# Altium PCB Standby_PS_V2..PcbDoc (part 2 of 2)
Units mm, origin at the board's own origin, x right, y up, seen from the top; angles counter-clockwise.
Board outline 250 x 85 mm, 2 copper layers (Top Layer, Bottom Layer), stack 1.071 mm thick; 195 components, 81 nets, 445 pads, 21 vias.
Unrouted connection lines stored in the file: 2.
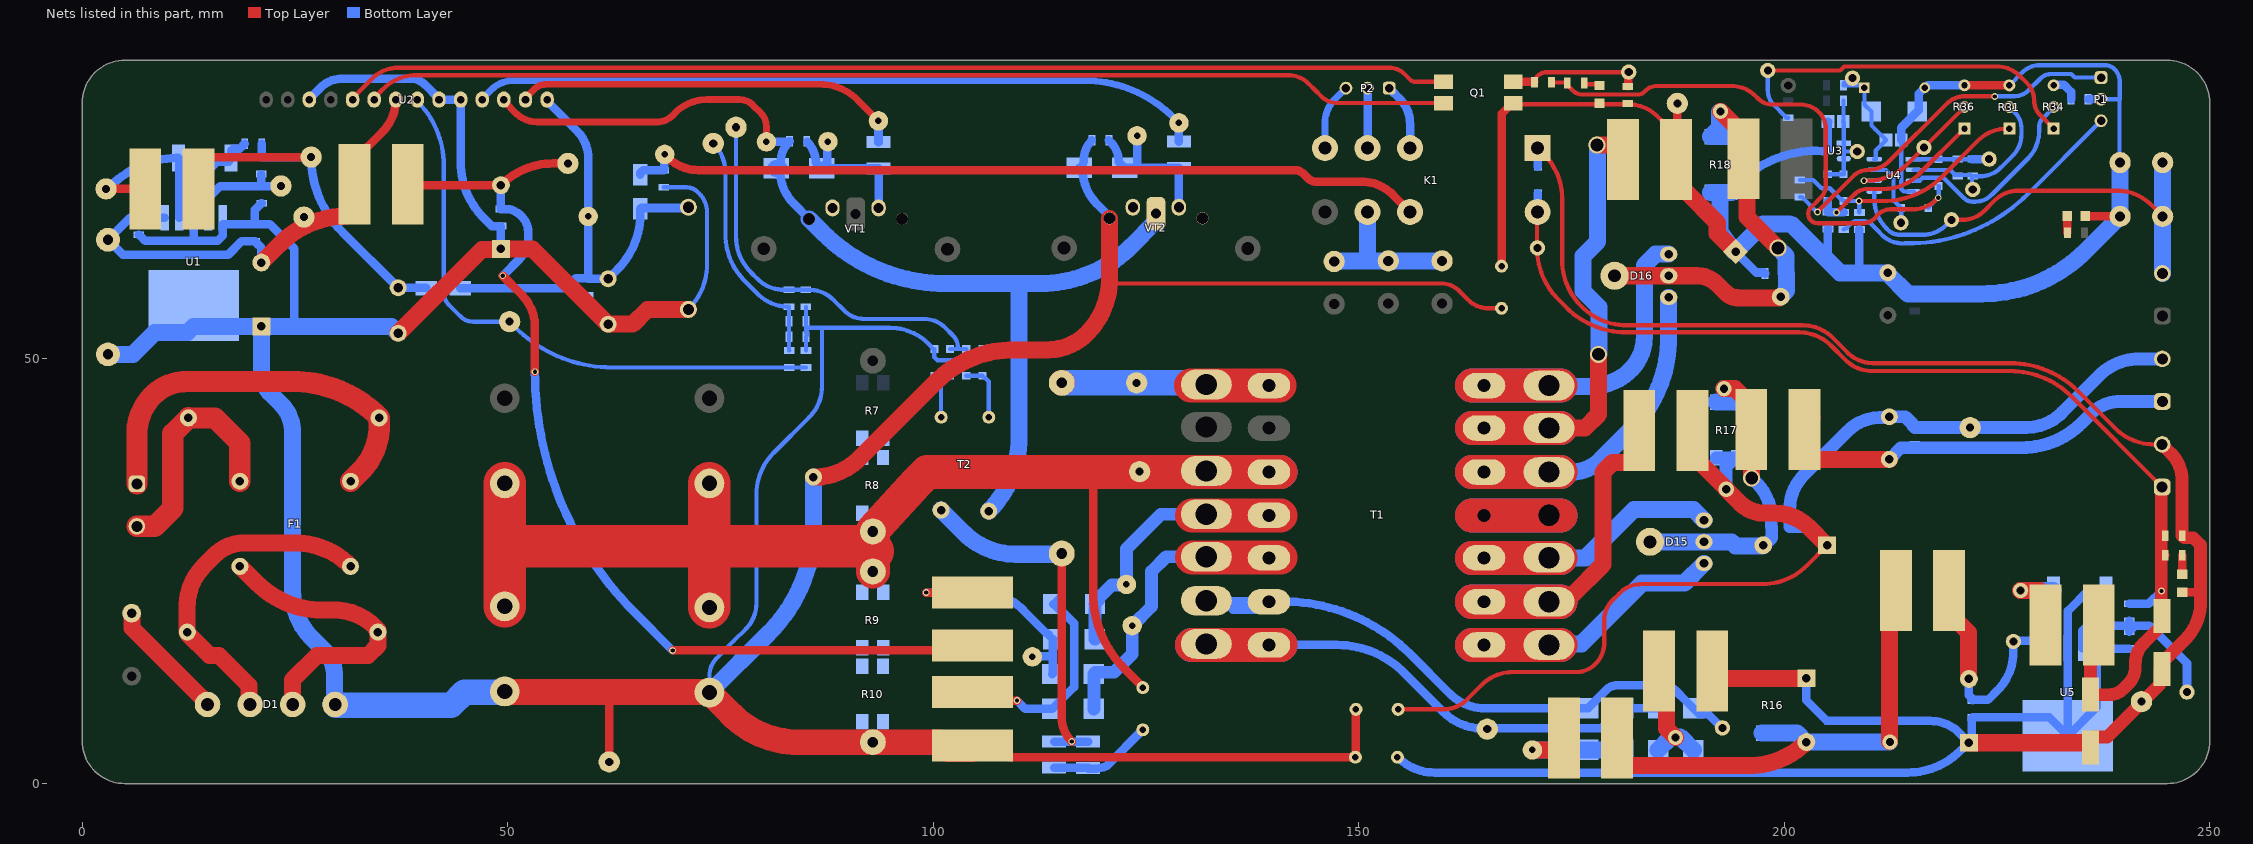
[diagram p2: the nets of this part, all layers, seen from the top]

## Via types
v1: diameter 0.8, hole 0.5, Top Layer to Bottom Layer, tented both sides, 14 vias
v2: diameter 2, hole 1.5, Top Layer to Bottom Layer, tented both sides, 4 vias
v3: diameter 2, hole 1, Top Layer to Bottom Layer, tented both sides, 2 vias
v4: diameter 1.8, hole 1, Top Layer to Bottom Layer, tented both sides, 1 vias

## Nets (pads, with @x,y where several pads share a name; then routed paths per layer and width w, separated by ;. In a path a pad name is that pad's centre, name@x,y a point inside that pad or via, vN(x,y) a via of type N, cw(c..) or ccw(c..) an arc to the next point about the centre after c; other vN are vias at no path point) (continued)
GND: C1.2 C2.1 C4.2 C5.2 C6.2 C8.2 C9.1 C12.2 C14.2 C16.1 C18.2 C19.2 C20.1 C21.1 C22.1 C23.1 C24.1 C25.1 C26.1 D1.1 D2.2 D8.2 D10.2 L3.1 R2.1 R6.2 R10.1 R23.2 TP2.1 U1.3 U1.5 U1.6 U2.5 U2.6 U2.12 VD2.1 VD4.2 VD5.2 VT2.3 | length 590.8
  Top Layer w0.4: C12.2@49.65,10.825 C12.2@49.712,10.762 ; C14.2@73.638,10.762 C14.2@73.7,10.7
  Top Layer w0.5: 61.4,10.762 61.925,10.237 ; 120.714,59.342 121.281,58.775 159.689,58.775 cw(c159.689,55.79) 161.798,57.902 161.801,57.899 162.871,56.829 162.873,56.827 ccw(c165.232,59.187) 165.232,55.85 165.234,55.85 C24.1@166.775,55.85 ; C26.1@149.6,3.1 C26.1@149.638,3.137 ; C25.1@149.638,8.687 C25.1@149.675,8.725
  Top Layer w1: TP2.1@61.925,2.55 61.925,10.237 ; L3.1@104.625,4.5 107.5,4.5 108.9,3.1 C26.1@149.6,3.1 ; C26.1@149.638,3.137 C25.1@149.638,8.687
  Top Layer w2: C1.2@37.125,52.925 46.975,62.775 49.15,62.775 C8.2@49.2,62.825 52.925,62.825 61.767,53.983 64.683,53.983 66.425,55.725 VD5.2@71.225,55.725 ; v3(85.925,36) ccw(c85.925,43.68) 91.358,38.251 100.259,47.153 cw(c109.485,37.928) 109.485,50.975 113.488,50.975 113.49,50.975 ccw(c113.49,57.39) 118.026,52.853 ccw(c111.54,59.342) 120.714,59.342 ; 120.714,59.344 VT2.3@120.714,66.43
  Top Layer w3: C12.2@49.712,10.762 61.4,10.762 C14.2@73.638,10.762 ; C14.2@73.7,10.7 76.284,8.116 ccw(c84.131,15.968) 84.131,4.867 84.135,4.867 C16.1@92.9,4.867 100.908,4.867 101.725,4.05 L3.1@104.6,4.05
  Bottom Layer w0.5: C18.2@59.45,57.375 59.45,56.333 C19.2@61.8,53.983 ; C20.1@68.325,70.067 70.998,70.067 cw(c70.998,68.234) 72.294,69.531 72.296,69.529 72.524,69.301 72.527,69.298 cw(c70.355,67.128) 73.425,67.128 73.425,61.036 cw(c65.914,61.036) VD5.2@71.225,55.725 ; C14.2@73.7,10.7 73.7,12.672 cw(c76.67,12.67) 74.571,14.771 76.595,16.795 77.982,18.182 ccw(c74.987,21.18) 79.225,21.18 79.225,33.976 79.225,33.977 cw(c86.16,33.977) 81.258,38.883 85.443,43.068 ccw(c81.869,46.644) 86.925,46.644 ; C23.1@85.042,50.9 C22.1@85.042,52.525 85.161,52.644 85.161,53.491 85.233,53.563 86.711,53.563 ; C22.1@85.042,52.95 C21.1@85.042,56 ; v3(85.925,36) v3@85.925,36.406 ; 86.925,46.675 86.925,53.349 86.711,53.563 ; D8.2@99.975,51.075 ccw(c94.901,47.145) 94.901,53.563 86.711,53.563 ; D8.2@100.125,51.075 100.125,50.111 100.486,49.75 105.414,49.75 105.775,50.111 D10.2@105.775,51.075
  Bottom Layer w1: C2.1@6.65,64.5 6.75,64.4 6.775,64.4 7.4,63.775 13.083,63.775 ; U1.5@16.487,65.733 16.487,64.361 15.901,63.775 13.083,63.775 ; U1.5@16.495,65.733 16.503,65.725 C4.2@20.289,65.725 ; C9.1@19.1,75.2 19.1,75.175 19,75.075 18.975,75.075 18.525,74.625 17.76,74.625 17.5,74.365 D2.2@17.5,73.525 17.24,73.265 17.24,73.076 15.826,73.076 13.091,70.341 U1.3@13.091,66.491 13.083,66.483 13.083,63.775 ; R2.1@21.076,68.2 21.051,68.2 20.289,67.438 C4.2@20.289,65.725 ; 24.925,54.05 24.925,62.844 22.044,65.725 C4.2@20.289,65.725 ; U2.12@26.685,80.375 26.685,80.46 27.986,81.761 cw(c30.609,79.138) 30.609,82.847 30.611,82.847 38.54,82.847 cw(c38.54,80.404) 40.268,82.132 40.27,82.13 U2.6@41.925,80.475 ; U2.6@41.925,80.375 U2.5@44.465,80.375 44.465,73.032 44.465,73.03 ccw(c53.771,73.03) 47.186,66.454 48.127,65.513 C6.2@49.2,65.513 C8.2@49.2,62.825 ; VD4.2@117.172,72.35 VD4.2@117.357,72.35 ; R6.2@118.65,75.6 ccw(c121.011,73.239) 117.672,73.241 117.672,73.05 117.472,72.35 VD4.2@117.357,72.35 ; VT2.3@120.714,66.43 120.714,66.636 119.224,68.126 cw(c123.248,72.15) 117.579,71.65 117.557,72.15 VD4.2@117.357,72.35
  Bottom Layer w2: VD2.1@3.025,50.444 5.969,50.444 8.521,52.996 12.362,52.996 13.091,53.725 C5.2@21.048,53.725 ; D1.1@29.65,9.375 29.65,12.717 ccw(c25.527,12.717) 28.442,15.633 27.021,17.054 27.017,17.058 cw(c32.551,22.592) 24.725,22.592 24.725,22.595 24.725,41.295 ccw(c20.065,41.295) 23.36,44.59 22.109,45.841 cw(c24.668,48.401) 21.048,48.4 21.048,53.675 C5.2@21.048,53.725 ; C1.2@37.125,52.925 36.325,53.725 C5.2@21.048,53.725 ; C14.2@73.7,10.7 80.677,17.677 ccw(c68.014,30.344) 85.925,30.344 v3(85.925,36)
  Bottom Layer w3: D1.1@29.725,9.3 29.8,9.225 43.386,9.225 44.89,10.729 49.554,10.729 C12.2@49.65,10.825
GND_1: C24.2 C27.1 C28.1 C30.1 C37.2 C40.2 C41.1 C42.2 C43.1 C45.2 D17.2 D19.2 D20.2 L9.2 P1.2 Q1.1 R18.1 R25.1 R26.1 R31.3 R32.1 R36.3 R46.1 TP43.1 U3.3 U4.4 | length 219.7
  Top Layer w0.5: Q1.1@168.15,79.93 168.255,79.825 181.663,79.825 cw(c181.663,74.967) 185.096,78.404 185.675,77.825 187.3,76.2 L9.2@187.3,73.325
  Top Layer w1: C24.2@166.784,60.696 166.784,78.684 167.55,79.45 167.55,79.58 167.9,79.93 Q1.1@168.15,79.93 ; L9.2@187.3,73.325 187.439,73.464 TP43.1@187.439,79.93 ; R36.3@221.175,82.05 221.18,82.045 226.445,82.045 R31.3@226.45,82.04 ; D20.2@235.35,66.7 235.375,66.675 239.436,66.675 R25.1@239.461,66.65
  Top Layer w2: L9.2@187.3,73.325 187.3,70.45 188.175,69.575 188.45,69.575 192.125,65.9 192.125,64.65 C37.2@194.273,62.502
  Bottom Layer w0.5: C40.2@213.741,75.625 213.741,69.871 214.034,69.578 215.198,69.578 U4.4@215.207,69.57 ; R31.3@226.45,82.04 228.008,83.598 cw(c229.997,81.612) 229.997,84.423 237.691,84.423 cw(c237.691,82.866) 238.791,83.967 cw(c237.262,82.438) 239.425,82.438 239.425,80.425 ; P1.2@237.225,80.425 239.35,80.425 239.425,80.35 ; 239.4,80.375 239.4,73.036 R26.1@239.461,72.975
  Bottom Layer w1: R18.1@193.775,69.47 193.995,69.87 194.75,70.625 cw(c203.74,61.636) U3.3@205.032,74.283 ; C37.2@194.273,62.502 196.717,60.058 197.65,60.058 197.75,59.958 C41.1@197.75,59.933 ; U3.3@205.089,74.397 205.089,77.75 C27.1@205.14,77.8 ; 205.106,61.461 205.106,65.137 C30.1@205.144,65.175 ; C28.1@208.841,65.125 208.841,60.224 209.04,60.025 ; C40.2@213.741,75.625 213.741,77.076 215.785,79.119 215.785,81.039 D17.2@216.521,81.775 216.588,81.775 216.863,82.05 R36.3@221.175,82.05 ; R32.1@235.7,80.425 P1.2@237.225,80.425
  Bottom Layer w2: R18.1@191.325,69.47 192.45,69.47 ; R18.1@193.775,69.47 192.45,69.47 ; C37.2@194.107,62.531 192.45,64.9 192.45,69.47 ; C37.2@194.284,62.891 194.662,62.891 197.523,65.751 200.617,65.751 200.956,65.611 205.106,61.461 206.542,60.025 209.04,60.025 C45.2@212.175,60.025 212.175,59.891 214.516,57.55 C43.1@215.35,57.55 223.245,57.55 223.247,57.55 ccw(c223.247,74.724) 235.392,62.581 R25.1@239.461,66.65 R26.1@239.461,72.975
GND_2: C25.2 C33.2 C36.1 C38.2 C39.1 J3.2 L8.2 R17.1 TP42.1 | length 149.8
  Top Layer w0.5: C25.2@154.625,8.725 159.935,8.725 159.937,8.725 ccw(c159.937,12.68) 162.735,9.885 164.441,11.591 cw(c168.081,7.954) 168.081,13.1 175.505,13.1 ccw(c175.509,16.337) 177.802,14.052 ccw(c175.271,16.582) 178.85,16.582 178.85,19.243 178.85,19.245 cw(c182.072,19.245) 179.795,21.525 180.621,22.351 cw(c183.274,19.701) 183.274,23.45 197.474,23.45 197.475,23.45 ccw(c197.475,30.692) 202.597,25.572 C33.2@205.025,28
  Top Layer w2: L8.2@189.211,41.5 189.211,38.625 193.165,34.67 v4(193.165,34.6) 194.804,32.962 ccw(c197.674,35.838) 197.674,31.775 198.856,31.775 198.862,31.775 cw(c198.861,26.007) 202.939,30.086 204.975,28.05 C33.2@205.025,28
  Bottom Layer w1.5: R17.1@192,38.275 R17.1@194.45,38.275 194.425,38.25 194.425,38.125 194.069,38.125 193.165,37.221 v4(193.165,34.6) ; C36.1@200.646,30.2 200.646,32.271 cw(c206.289,32.268) 202.3,36.259 207.5,41.459 cw(c211.229,37.733) 211.229,43.004 212.254,43.004 C38.2@212.35,43.1 214.221,43.1 215.1,42.221 215.1,42.075 C39.1@215.325,41.85 228.429,41.85 228.431,41.85 ccw(c228.431,47.809) 232.646,43.596 237.021,47.971 cw(c241.676,43.318) 241.676,49.9 J3.2@244.425,49.9 ; C36.1@200.671,30.225 202.8,30.225 C33.2@205.025,28
GND_3: C26.2 C29.2 C31.2 C32.2 C35.2 C44.2 C46.2 C47.2 D18.2 D21.2 J4.2 K1.1 L5.2 R16.1 R41.1 TP34.1 U5.3 U5.5 U5.6 VD11.2 | length 316.1
  Top Layer w0.5: K1.1@171.025,74.675 172.248,73.401 cw(c166.604,68.778) 173.9,68.778 173.9,68.776 173.9,61.504 173.9,61.502 ccw(c181.51,61.502) 176.129,56.121 176.13,56.12 176.23,56.02 176.232,56.018 ccw(c181.466,61.252) 181.466,53.85 181.468,53.85 202.179,53.85 cw(c202.179,48.927) 205.66,52.409 205.662,52.406 207.372,50.696 207.374,50.694 ccw(c210.499,53.818) 210.499,49.4 210.5,49.4 226.59,49.4 cw(c226.59,38.21) 234.502,46.123 234.504,46.121 238.844,41.781 238.847,41.778 ccw(c243.502,46.434) 243.498,39.85 J4.2@244.4,39.85
  Top Layer w1: L5.2@191.541,13.25 L5.2@192.416,12.375 ; D21.2@246.768,22.498 248.802,22.498 248.925,22.375
  Top Layer w1.5: C46.2@235.975,4.8 235.975,5.227 236.225,5.477 237.953,5.477 242.656,10.18 244.125,11.649 244.125,13.237 C44.2@244.375,13.487 244.375,14.487 244.625,14.737 244.911,14.737 247.118,16.945 ccw(c242.758,21.306) 248.925,21.306 248.925,22.375 248.925,28.021 248.046,28.9 246.993,28.9 C47.2@246.768,29.125 ; J4.2@244.4,39.85 245.459,38.791 cw(c242.36,35.692) 246.743,35.692 246.743,35.689 C47.2@246.743,29.15
  Top Layer w2: L5.2@192.416,12.375 C29.2@202.6,12.375 ; C32.2@221.7,4.8 235.975,4.8 C46.2@235.975,4.227
  Bottom Layer w1: C26.2@154.563,3.112 ccw(c158.923,7.45) 158.923,1.3 214.482,1.3 214.484,1.3 ccw(c214.484,10.15) 219.84,3.105 221.15,4.25 C32.2@221.65,4.75 ; K1.1@171.025,74.675 171.05,74.65 VD11.2@171.05,72.5 ; R16.1@197.4,12.475 197.45,12.425 199.85,12.425 202.55,12.425 C29.2@202.6,12.375 202.6,9.775 205.01,7.365 217.153,7.365 cw(c217.153,2.399) 220.115,6.385 220.17,6.33 221.15,5.35 C32.2@221.7,4.875 ; C32.2@221.7,4.8 222.025,5.125 222.025,7.675 222.05,7.675 C35.2@222.15,7.775 231.155,7.775 U5.6@233.325,5.605 ; U5.5@236.729,15.91 U5.5@236.729,15.868 ; D18.2@237.83,22.75 235.787,22.75 233.325,20.288 U5.3@233.325,15.91 U5.6@233.325,5.605 ; R41.1@240.525,15.86 236.737,15.86 U5.5@236.729,15.868 ; U5.6@233.325,5.605 236.729,9.009 U5.5@236.729,15.868
I_SENS: J2.2 R25.2 R26.2 TP37.1 U4.5 | length 53.3
  Top Layer w0.5: TP37.1@219.65,66.25 221.035,66.25 ccw(c221.033,69.67) 223.452,67.253 224.713,68.514 cw(c227.513,65.718) 227.513,69.675 227.515,69.675 239.113,69.675 cw(c239.113,64.066) 243.077,68.034 R25.2@244.461,66.65
  Bottom Layer w0.5: U4.5@210.575,69.57 210.575,68.756 ccw(c215.607,68.76) 212.049,65.201 212.05,65.2 212.197,65.053 ccw(c213.556,66.408) 213.556,64.489 216.277,64.489 216.278,64.489 ccw(c216.278,68.378) 219.028,65.628 TP37.1@219.65,66.25 ; J2.2@244.425,59.95 J2.2@244.443,59.968 ; R26.2@244.443,72.957 R26.2@244.461,72.975 R26.2@244.536,72.9
  Bottom Layer w2: J2.2@244.443,59.968 R26.2@244.443,72.957 ; R25.2@244.461,66.65 R25.2@244.562,66.65
NetC1_1: C1.1 C9.2 L4.2 R1.2 TP7.1 VD1.2 | length 46
  Top Layer w1: L4.2@13.65,69.875 13.65,72.25 15.025,73.625 TP7.1@26.9,73.625
  Bottom Layer w1: R1.2@21.051,73.625 TP7.1@26.9,73.625 ccw(c39.311,73.625) 30.535,64.849 30.538,64.846 C1.1@37.125,58.259 37.142,58.242 40.408,58.242 VD1.2@40.425,58.225 ; R1.2@21.051,73.625 21.1,73.674 C9.2@21.1,75.2
NetC2_2: C2.2 C4.1 C5.1 L1.1 TP1.1 U1.1 U2.8 VD2.2 | length 56.6
  Top Layer w1: L1.1@32,70.425 32,73.3 35.266,76.566 ccw(c31.461,80.375) 36.835,80.045 36.845,80.21 U2.8@36.845,80.375
  Top Layer w2: C5.1@21.048,61.225 23.227,63.403 cw(c31.125,55.505) 31.125,66.675 L1.1@32,70.425
  Bottom Layer w1: U1.1@9.687,66.491 9.679,66.5 5.619,66.5 VD2.2@3.025,63.906 4.781,62.15 17.15,62.15 18.725,63.725 20.314,63.725 20.514,63.525 20.514,63.5 21.048,62.966 C5.1@21.048,61.225
NetC3_1: C3.1 F1.2 J1.1 | length 47.6
  Top Layer w2.5: J1.1@6.425,35.225 6.425,41.082 6.425,41.086 cw(c12.819,41.086) 8.296,45.605 8.3,45.609 cw(c12.262,41.645) 12.262,47.25 24.735,47.25 cw(c24.735,32.91) C3.1@34.875,43.05 ; F1.2@31.525,35.525 32.673,36.673 ccw(c27.296,42.05) 34.9,42.05 34.9,42.95 C3.1@34.875,42.975
NetC3_2: C3.2 F1.1 J1.2 | length 28.2
  Top Layer w2.5: J1.2@6.425,30.225 8.512,30.225 10.65,32.363 10.65,41.15 C3.2@12.475,42.975 ; C3.2@12.5,42.95 15.6,42.95 18.525,40.025 F1.1@18.525,35.525
NetC6_1: C6.1 C8.1 L1.2 L2.1 TP3.1 | length 119.2
  Top Layer w1: L1.2@38.25,70.425 38.35,70.325 C8.1@49.2,70.325 cw(c55.356,64.169) 55.356,72.875 TP3.1@57.071,72.875 ; v1(49.405,59.685) 51.635,57.455 cw(c47.854,53.676) 53.2,53.676 v1(53.2,48.4) ; v1(69.375,15.65) 104.05,15.65 L2.1@104.625,16.225
  Bottom Layer w1: C8.1@49.2,70.325 C6.1@49.2,67.513 49.745,67.513 cw(c49.745,65.057) 51.481,66.794 51.484,66.791 51.699,66.576 51.701,66.574 cw(c50.025,64.898) 52.395,64.899 52.395,64.896 52.395,64.202 cw(c48.643,64.202) 51.295,61.548 49.433,59.685 v1(49.405,59.685) ; v1(53.2,48.4) ccw(c93.216,48.4) 64.92,20.105 64.923,20.102 v1(69.375,15.65)
NetC7_1: C7.1 D1.3 F1.3 | length 39.2
  Top Layer w2: D1.3@19.7,9.325 19.593,9.432 19.593,11.532 16.075,15.05 14.975,15.05 12.35,17.675 C7.1@12.35,17.8 12.325,17.825 12.325,20.755 cw(c19.2,20.752) 14.34,25.615 15.56,26.835 cw(c19.034,23.365) 19.034,28.275 19.037,28.275 25.041,28.275 cw(c25.041,19.26) F1.3@31.415,25.635
NetC7_2: C7.2 D1.2 F1.4 | length 35.2
  Top Layer w2: F1.4@18.525,25.525 18.575,25.525 20.548,23.552 ccw(c28.163,31.174) 28.163,20.4 28.166,20.4 29.584,20.4 cw(c29.584,13.541) 34.221,18.595 cw(c32.869,17.122) C7.2@34.75,17.8 ; D1.2@24.725,9.3 24.725,12.2 27.575,15.05 33.578,15.05 34.775,16.247 C7.2@34.775,18.028
NetC10_1: C10.1 R11.1 R12.1 T2.2 | length 42.2
  Top Layer w1: C10.1@115.1,27.03 115.1,7.763 115.1,7.761 ccw(c119.085,7.761) v1(116.267,4.944)
  Bottom Layer w1: R12.1@114.225,4.944 v1(116.267,4.944) R11.1@118.2,4.944
  Bottom Layer w2: T2.2@100.925,32.143 103.608,29.459 ccw(c109.673,35.532) 109.673,26.95 109.676,26.95 C10.1@115.001,26.95
NetC10_2: C10.2 T1.1 TP13.1 | length 17.9
  Top Layer w3: C10.2@115.116,47.112 115.122,47.105 C10.2@115.142,47.125
  Bottom Layer w3: C10.2@115.142,47.125 132.084,47.125 T1.1@133.025,47.125
NetC11_2: C11.2 C12.1 C13.2 C14.1 C15.1 C16.2 C17.2 R8.1 R9.2 T1.3 TP17.1 | length 147.1
  Top Layer w1: 118.35,36.936 118.8,36.486 118.8,22.329 ccw(c131.238,22.327) 122.44,13.535 C17.2@124.834,11.141
  Top Layer w4: C16.2@92.9,24.933 92.9,27.3 C15.1@92.9,29.625 ; C15.1@92.9,29.73 98.053,35.373 98.117,35.437 99.289,36.609 118.677,36.609 TP17.1@124.209,36.609 ; TP17.1@124.291,36.609 T1.3@131.957,36.609
  Top Layer w5: C12.1@49.65,20.825 49.65,27.9 ; C11.2@49.65,35.275 49.65,27.9 ; C14.1@73.7,20.7 73.7,27.9 ; C13.2@73.7,35.275 73.7,27.9 ; 92.9,27.3 92.3,27.9 73.7,27.9 ; 49.65,27.9 73.7,27.9
NetC17_1: C17.1 R11.2 R12.2 | length 12.3
  Bottom Layer w1: R12.2@114.2,1.867 114.212,1.855 118.188,1.855 R11.2@118.2,1.842 ; R11.2@118.191,1.744 119.103,1.746 ccw(c118.635,6.413) 120.347,2.047 120.504,2.204 C17.1@124.625,6.325
NetC18_1: C18.1 C19.1 TP19.1 U2.1 VD1.1 VD5.1 VD6.1 | length 55.8
  Bottom Layer w1: VD1.1@44.425,58.225 56.85,58.225 58,59.375 C18.1@59.45,59.375 ; U2.1@54.625,80.375 54.625,80.21 58.131,76.704 58.134,76.701 cw(c54.955,73.523) 59.45,73.523 TP19.1@59.45,66.647 C18.1@59.45,59.375 ; VD5.1@71.225,67.725 71.137,67.637 65.663,67.637 VD6.1@65.575,67.548 65.574,66.798 cw(c56.371,66.904) 62.88,60.397 C19.1@61.8,59.317 61.771,59.346 59.479,59.346 C18.1@59.45,59.375
NetC20_2: C20.2 K1.7 TP20.1 VD6.2 | length 94.9
  Top Layer w1: TP20.1@68.45,73.939 68.8,73.589 ccw(c72.4,77.197) 72.4,72.1 142.407,72.1 cw(c142.407,70.487) 143.545,71.63 144.074,71.101 ccw(c144.984,72.014) 144.983,70.725 150.348,70.725 cw(c150.348,65.59) 153.977,69.223 K1.7@156.025,67.175
  Bottom Layer w1: VD6.2@65.575,71.548 65.575,71.75 65.925,72.1 C20.2@68.325,72.1 ; C20.2@68.325,72.067 68.388,72.13 68.388,73.974 TP20.1@68.331,74.031
NetC21_2: C21.2 D7.1 D9.1 R22.1 TP22.1 | length 48
  Bottom Layer w0.5: TP22.1@77.05,77.75 76.825,77.525 76.825,64.277 76.825,64.275 ccw(c82.741,64.275) 78.558,60.092 78.56,60.09 79.34,59.31 79.342,59.308 ccw(c82.44,62.407) 82.437,58.025 82.667,58.025 C21.2@85.017,58.025 85.242,58.025 85.406,58.025 cw(c85.406,53.943) 88.294,56.827 89.562,55.559 89.564,55.557 ccw(c91.875,57.868) 91.875,54.6 98.946,54.6 cw(c98.946,51.15) 101.386,53.589 101.387,53.588 102.299,52.676 102.301,52.674 cw(c100.856,51.228) 102.9,51.228 102.9,51.075 ; D7.1@101.975,51.075 102.9,51.075 ; D9.1@103.875,51.075 102.9,51.075
NetC22_2: C22.2 R22.2 R23.1 R24.1 TP23.1 | length 28.5
  Bottom Layer w0.5: TP23.1@74.15,75.229 74.153,75.226 cw(c70.71,71.789) 75.575,71.79 75.575,71.787 75.575,64.565 ccw(c83.397,64.565) 77.867,59.033 79.341,57.559 79.343,57.557 ccw(c83.042,61.256) 82.667,56.038 R22.2@83.042,56.025 83.054,56.012 83.054,54.325 83.054,52.525 83.054,50.912 R24.1@83.067,50.9
NetC23_2: C23.2 R24.2 TP24.1 U2.7 | length 69.3
  Bottom Layer w0.5: U2.7@39.385,80.375 39.385,80.21 39.921,79.588 cw(c31.901,72.681) 42.485,72.681 42.485,57.697 42.485,57.696 ccw(c44.524,57.696) 43.082,56.254 43.084,56.252 44.435,54.902 44.436,54.9 ccw(c45.934,56.398) 45.934,54.28 45.936,54.28 TP24.1@50.225,54.28 50.915,53.59 ccw(c62.248,64.938) 62.248,48.9 62.249,48.9 R24.2@83.067,48.9 C23.2@85.042,48.9
NetC27_2: C27.2 R30.1 TP30.1 U3.1 U3.2 VD7.2 VD8.2 | length 12.1
  Bottom Layer w0.5: VD8.2@205.116,71.6 VD7.2@206.966,71.6 206.979,71.613 206.979,73.419 U3.2@206.992,73.432 206.992,74.347 ; R30.1@206.952,80.225 206.952,77.81 C27.2@206.941,77.8 206.992,77.749 U3.1@206.992,75.262 206.992,74.347 ; TP30.1@208.575,74.275 207.064,74.275 206.992,74.347
NetC28_2: C28.2 R27.2 R31.1 VD7.1 | length 29.9
  Top Layer w0.5: v1(208.796,68.45) 211.617,68.45 211.618,68.45 ccw(c211.618,78.22) 218.528,71.313 222.774,75.559 cw(c226.154,72.182) 226,76.958 R31.1@226.45,76.96
  Bottom Layer w0.5: R27.2@201.841,70.925 203.416,70.925 204.391,69.95 205.35,69.95 206.65,68.65 206.766,68.65 VD7.1@206.966,68.45 ; VD7.1@206.941,68.45 v1(208.796,68.45) 208.818,68.427 208.818,67.148 C28.2@208.841,67.125
NetC29_1: C29.1 C31.1 L6.2 L7.1 R16.2 TP29.1 | length 59.4
  Top Layer w2: L6.2@180.35,5.35 180.35,3 181.225,2.125 195.931,2.125 195.934,2.125 ccw(c195.934,11.514) 202.15,4.478 C29.1@202.6,4.875 C29.1@202.573,4.875 ; TP29.1@212.35,4.948 212.35,21.65 L7.1@213.45,22.75
  Bottom Layer w2: R16.2@197.4,5.925 201.523,5.925 202.573,4.875 C29.1@202.6,4.875 TP29.1@212.35,4.875
NetC30_2: C30.2 R29.2 R36.1 VD8.1 | length 22
  Top Layer w0.5: v1(206.125,67.11) 208.283,69.269 cw(c209.739,67.816) 209.739,69.873 211.708,69.873 211.71,69.873 ccw(c211.71,75.589) 215.753,71.548 R36.1@221.175,76.97
  Bottom Layer w1: VD8.1@205.116,68.45 205.116,67.203 C30.2@205.144,67.175 205.169,67.15 206.966,67.15 R29.2@206.991,67.125
NetC32_1: C32.1 C35.1 L7.2 TP33.1 U5.1 | length 32.3
  Top Layer w0.5: L7.2@218.46,24.885 219.078,24.266 L7.2@220.022,23.322
  Top Layer w2: L7.2@218.46,24.885 218.46,23.647 L7.2@219.403,22.703 ; L7.2@219.375,22.675 219.375,19.8 220.25,18.925 220.478,18.925 221.65,17.753 221.65,12.377 221.681,12.346 C32.1@221.68,12.345
  Bottom Layer w1: C32.1@221.7,12.3 221.7,10.361 222.025,10.036 222.025,9.875 222.125,9.775 C35.1@222.15,9.775 ; C35.1@222.275,9.825 223.925,9.825 225.07,10.97 ccw(c220.593,15.448) 226.925,15.448 TP33.1@226.925,16.705 ; TP33.1@226.925,16.801 229.913,16.801 229.921,16.793 U5.1@229.921,15.91
NetC33_1: C33.1 C36.2 D15.2 L10.1 R17.2 TP36.1 | length 39.2
  Top Layer w2: D15.2@184.223,28.412 D15.2@184.241,28.394 ; TP36.1@192.925,46.4 194.2,46.4 196.125,44.475 L10.1@196.125,41.6 196.175,41.55 v2(196.175,35.925) ; C33.1@197.479,27.981 C33.1@197.492,27.967
  Bottom Layer w1.5: v2(196.175,35.925) 196.759,35.341 cw(c192.595,31.177) 198.484,31.177 C36.2@198.484,30.2 ; C33.1@197.55,27.902 198.525,28.877 C36.2@198.525,30.079
  Bottom Layer w2: D15.2@184.241,28.394 D15.2@190.573,28.394 ; D15.2@190.61,28.375 193.825,28.375 194.298,27.902 C33.1@197.4,27.902 ; R17.2@192,44.825 193.225,44.825 ; TP36.1@192.925,46.4 193.225,46.1 193.225,44.825 ; 193.279,44.879 193.225,44.825 ; R17.2@194.45,44.825 193.225,44.825
NetC34_1: C34.1 R35.1 TP46.1 U4.1 VD10.2 | length 8.9
  Bottom Layer w0.5: U4.1@215.207,73.38 218.141,73.38 220.266,73.38 221.416,73.38 221.424,73.388 R35.1@222.072,73.388 ; R35.1@222.15,73.382 R35.1@222.158,73.39 ; TP46.1@224.067,73.372 TP46.1@224.075,73.38
  Bottom Layer w1: R35.1@222.024,73.372 TP46.1@224.067,73.372
NetC34_2: C34.2 R31.2 R35.2 TP31.1 U4.2 | length 21
  Bottom Layer w0.5: U4.2@215.207,72.11 219.501,72.11 220,71.611 220,71.532 220.025,71.506 R35.2@221.872,71.506 ; TP31.1@221.99,69.6 222.07,69.68 222.07,71.252 R35.2@222.175,71.357 ; R35.2@222.015,71.363 222.525,71.363 223.031,71.363 ccw(c223.028,74.743) 225.419,72.355 226.832,73.767 ccw(c224.318,76.283) 227.875,76.283 227.875,77.007 ccw(c225.296,77.007) 227.12,78.83 R31.2@226.45,79.5
NetC37_1: C37.1 C41.2 D16.2 L11.1 R18.2 TP38.1 | length 51.5
  Top Layer w2: D16.2@180.073,59.675 D16.2@186.423,59.675 189.733,59.675 cw(c189.733,56.313) 192.108,58.692 193.05,57.75 ccw(c194.68,59.38) 194.676,57.075 199.383,57.075 C37.1@199.577,57.198 ; TP38.1@192.5,79 195.2,76.3 L11.1@195.2,73.425 195.625,73 195.625,66.575 v2(199.25,62.95)
  Bottom Layer w2: TP38.1@192.5,79 192.404,78.904 192.404,77.099 R18.2@191.325,76.02 R18.2@193.775,76.02 ; v2(199.25,62.95) 200.225,61.975 200.225,59.983 ; C37.1@199.577,57.198 200.275,57.95 200.275,59.933
NetC38_1: C38.1 C39.2 J3.1 L10.2 | length 49
  Top Layer w2: L10.2@203.25,43.025 202.375,42.15 L10.2@202.375,41.6 202.375,38.975 203.25,38.1 C38.1@212.35,38.1
  Bottom Layer w1.5: C38.1@212.35,38.1 213.725,39.475 215.325,39.475 227.949,39.475 227.951,39.475 ccw(c227.951,49.37) 234.949,42.374 236.065,43.49 cw(c239.467,40.09) 239.467,44.9 239.47,44.9 J3.1@244.425,44.9
NetC40_1: C40.1 C42.1 D17.1 R38.1 TP39.1 U4.8 | length 14.7
  Bottom Layer w0.5: TP39.1@208,83.162 207.839,83.162 206.952,82.275 R38.1@206.952,82.05 207.358,82.05 207.383,82.075 209.439,82.075 209.439,79.777 C42.1@210.241,78.975 210.241,77.324 210.705,76.86 210.73,76.86 211.94,75.651 C40.1@211.94,75.625 211.94,75.599 210.742,74.402 210.742,73.4 210.722,73.38 U4.8@210.575,73.38 ; TP39.1@208.081,82.838 TP39.1@208.175,82.932
NetC44_1: C44.1 C46.1 C47.1 J4.1 K1.8 L12.2 R40.2 R45.2 TP47.1 VD11.1 | length 134.1
  Top Layer w0.5: K1.8@171.025,67.175 170.95,67.1 170.95,62.95 ccw(c179.53,62.95) 173.463,56.883 173.465,56.881 174.413,55.933 174.416,55.93 ccw(c181.43,62.945) 181.43,53.025 181.431,53.025 201.725,53.025 cw(c201.725,47.653) 205.523,51.452 205.526,51.449 207.186,49.789 207.187,49.788 ccw(c210.356,52.957) 210.356,48.475 210.359,48.475 226.504,48.475 cw(c226.504,38.163) 233.795,45.455 233.798,45.453 J4.1@244.4,34.85 ; 244.289,26.787 R45.2@244.732,26.787 ; 244.289,29.15 244.314,29.125 C47.1@244.768,29.125
  Top Layer w1: R45.2@244.732,26.787 R45.2@244.768,26.823
  Top Layer w1.5: L12.2@236.958,18.65 235.975,17.667 C46.1@235.975,10.45 236.225,10.45 238.196,10.45 ccw(c238.195,12.817) 239.866,11.141 240.461,11.736 ccw(c238.557,13.641) 241.25,13.641 241.25,14.086 cw(c244.706,14.086) 242.262,16.53 244.193,18.46 C44.1@244.457,18.46 ; C44.1@244.289,19.796 244.289,26.787 ; 244.289,26.823 244.289,29.125 ; 244.289,29.15 J4.1@244.289,34.85
  Bottom Layer w1: K1.8@171.025,67.175 171.05,67.2 VD11.1@171.05,69.35 ; R40.2@240.525,21.127 242.827,21.127 v1(244.325,22.625)
NetD1_4: D1.4 RT1.2 | length 14.3
  Top Layer w2: RT1.2@5.8,20.025 5.838,19.987 5.838,18.287 D1.4@14.725,9.4
NetD2_1: D2.1 L4.1 TP4.1 U1.2 | length 21.1
  Top Layer w1: TP4.1@2.8,69.875 L4.1@7.4,69.875
  Bottom Layer w1: TP4.1@2.8,69.875 4.261,71.05 cw(c11.29,62.308) 11.03,73.522 D2.1@11.29,73.525 11.381,73.434 11.381,72.685 11.381,66.499 U1.2@11.389,66.491
NetD3_1: D3.1 D5.1 L2.2 TP5.1 | length 28.4
  Top Layer w1: v1(99.175,22.45) 104.6,22.45 L2.2@104.625,22.475
  Bottom Layer w0.5: TP5.1@111.716,14.525 TP5.1@111.739,14.548
  Bottom Layer w1: v1(99.175,22.45) 105.649,22.45 cw(c105.649,15.507) 110.558,20.417 110.56,20.414 113.325,17.65 113.419,17.65 113.625,17.444 D3.1@113.625,17.35 ; TP5.1@111.641,14.9 111.687,14.946 114.056,14.946 ; D5.1@113.994,12.875 114.056,12.938 114.056,14.946 ; D3.1@114.119,16.95 114.056,16.887 114.056,14.946
NetD3_2: D3.2 D4.1 T1.4 TP8.1 | length 23.8
  Bottom Layer w1.5: D4.1@119,20.564 D3.2@119,16.95 D3.2@119.036,16.986 ; D4.1@119.006,21.1 119.206,21.3 D4.1@119.206,21.556 ; D4.1@119.206,21.55 119.456,21.55 119.456,21.806 120.976,23.326 122.626,23.326 TP8.1@122.65,23.35 ; TP8.1@122.7,23.4 122.7,27.6 126.756,31.656 130.416,31.656 T1.4@132.084,31.656
NetD4_2: D4.2 D6.2 L3.2 | length 25.5
  Top Layer w1: L3.2@104.625,10.75 105.625,9.75 v1(109.85,9.75)
  Bottom Layer w1: v1(109.85,9.75) 110.8,8.8 113.95,8.8 D6.2@113.975,8.775 116.55,11.35 116.55,18.85 115,20.4 114.825,20.4 D4.2@114.125,21.1 ; D4.2@114.2,21.1 D4.2@114.823,21.723
NetD5_2: D5.2 D6.1 T1.5 TP11.1 | length 27.5
  Bottom Layer w1.5: D6.1@118.856,8.775 118.875,8.794 D5.2@118.875,12.875 ; D5.2@118.961,12.961 119.075,13.075 121.225,13.075 123.375,15.225 TP11.1@123.375,18.55 125.65,20.825 125.65,24.94 127.372,26.662 T1.5@130.416,26.662 ; T1.5@131.113,26.535 T1.5@131.24,26.662 ; T1.5@131.24,26.662 T1.5@132.084,26.662 T1.5@131.24,26.662
NetD7_2: D7.2 D8.1 T2.4 | length 6.7
  Bottom Layer w0.5: D8.1@100.125,47.925 100.925,47.925 ; T2.4@100.931,43.05 100.925,43.056 100.925,47.925 ; D7.2@101.975,47.925 100.925,47.925
NetD9_2: D9.2 D10.1 T2.3 | length 7.1
  Bottom Layer w0.5: D9.2@103.875,47.925 D10.1@105.775,47.925 105.975,47.725 106.05,47.725 106.525,47.25 T2.3@106.525,43.05
NetD11_1: D11.1 D12.2 T1.7 TP25.1 | length 49
  Bottom Layer w1: T1.7@140.45,16.289 147.458,16.289 cw(c147.458,5.178) 155.313,13.037 155.317,13.033 159.934,8.416 159.937,8.413 ccw(c164.616,13.092) 164.616,6.475 TP25.1@165.1,6.475 ; TP25.1@165.1,6.4 165.175,6.475 178.475,6.475 180.15,8.15 180.375,8.15 D12.2@181.075,8.85 181.084,8.841 185.165,8.841 D11.1@185.175,8.831
NetD11_2: D11.2 D13.2 L5.1 TP27.1 | length 14
  Top Layer w2: L5.1@185.2,13.159 186.15,12.209 186.15,6.491 TP27.1@187.225,5.416
  Bottom Layer w2: D11.2@185.175,3.95 186.731,5.506 187.135,5.506 TP27.1@187.225,5.416 ; TP27.1@187.309,5.5 187.775,5.5 D13.2@189.325,3.95
NetD12_1: D12.1 D14.1 L6.1 TP28.1 | length 16
  Top Layer w1: L6.1@172.725,3.95 174.1,5.325 L6.1@174.1,5.35
  Top Layer w2: TP28.1@170.4,3.95 L6.1@172.725,3.95
  Bottom Layer w1: TP28.1@170.4,3.95 TP28.1@170.409,3.959 ; D14.1@176.94,3.959 D14.1@176.95,3.969 ; D12.1@181.075,3.969 D12.1@181.775,3.269
  Bottom Layer w2: TP28.1@170.409,3.959 D14.1@176.94,3.959 ; D14.1@176.95,3.969 D12.1@181.075,3.969
NetD13_1: D13.1 D14.2 T1.6 TP26.1 | length 71.8
  Top Layer w1: TP26.1@192.725,6.55 TP26.1@192.825,6.65
  Bottom Layer w1: T1.6@132.084,21.496 132.148,21.432 139.387,21.432 T1.6@139.45,21.369 ; 135.2,20.444 T1.6@139.256,20.444 ; T1.6@139.453,21.335 cw(c141.104,0.225) 156.076,15.199 160.727,10.548 160.73,10.545 ccw(c164.822,14.637) 164.822,8.85 164.824,8.85 D14.2@176.95,8.85 177.65,9.55 179.268,11.168 179.362,11.262 cw(c180.455,9.509) 180.455,11.575 185.396,11.575 185.4,11.575 cw(c185.399,8.374) 187.024,11.132 187.123,11.033 188.625,9.531 190.025,8.131 191.094,8.131 192.443,6.782 192.443,6.543 TP26.1@192.425,6.525
NetD15_1: D15.1 T1.8 | length 22.2
  Bottom Layer w2: T1.8@172.343,16.289 172.479,16.425 176.175,16.425 183.3,23.55 188.251,23.55 D15.1@190.573,25.872
NetD15_3: D15.3 T1.10 | length 21.1
  Bottom Layer w1: T1.10@172.343,26.535 T1.10@173.013,26.535
  Bottom Layer w2: T1.10@173.013,26.535 176.66,26.535 182.325,32.2 189.325,32.2 D15.3@190.573,30.952
NetD16_1: D16.1 T1.12 | length 28.2
  Bottom Layer w2: T1.12@172.343,36.609 173.593,36.609 175.043,36.609 ccw(c175.04,41.314) 178.367,37.987 181.907,41.527 ccw(c171.009,52.427) 186.423,52.427 186.423,52.43 D16.1@186.423,57.135
NetD16_3: D16.3 T1.14 | length 26.3
  Bottom Layer w2: T1.14@172.343,46.769 173.187,46.769 173.306,46.65 177.193,46.65 ccw(c177.19,53.373) 181.946,48.621 181.991,48.666 ccw(c178.232,52.428) 183.55,52.428 183.55,60.875 184.89,62.215 D16.3@186.423,62.215
NetD18_1: D18.1 L12.1 TP44.1 U5.2 | length 15.9
  Top Layer w2: TP44.1@227.775,22.7 230.075,22.7 230.95,21.825 L12.1@230.95,20.1
  Bottom Layer w1: D18.1@231.573,22.703 D18.1@231.62,22.75 231.621,22.749 231.621,15.912 U5.2@231.623,15.91
  Bottom Layer w2: TP44.1@227.825,22.703 D18.1@231.573,22.703
NetD19_1: D19.1 R42.1 | length 1.9
  Top Layer w0.5: R42.1@176.5,82.325 176.65,82.175 178.15,82.175 D19.1@178.3,82.025
NetD20_1: D20.1 R44.1 | length 1.9
  Top Layer w1: R44.1@233.25,64.75 D20.1@233.25,66.7
NetD21_1: D21.1 R45.1 | length 2.2
  Top Layer w1: D21.1@246.768,24.598 R45.1@246.768,26.823
NetK1_2: K1.2 P2.1 | length 7.9
  Bottom Layer w1: P2.1@153.575,81.725 153.825,81.475 154.801,80.499 cw(c151.848,77.545) 156.025,77.545 K1.2@156.025,74.675
NetK1_3: K1.3 P2.2 | length 7.1
  Bottom Layer w1: K1.3@151.025,74.675 151.03,74.68 151.03,81.72 P2.2@151.035,81.725
NetK1_4: K1.4 P2.3 | length 7.9
  Bottom Layer w0.8: K1.4@146.025,74.675 146.025,77.593 146.025,77.595 cw(c150.033,77.595) 147.199,80.429 P2.3@148.495,81.725
NetK1_6: K1.6 R13.1 R14.1 R15.1 | length 18.6
  Bottom Layer w2: R14.1@147.112,61.35 147.15,61.387 151.025,61.387 ; K1.6@151.025,67.175 151.025,61.425 R15.1@153.437,61.425 ; R15.1@153.342,61.387 159.75,61.387 R13.1@159.787,61.425
NetL8_1: L8.1 T1.9 | length 27
  Top Layer w2: T1.9@172.374,21.4 174.03,21.4 174.749,22.119 175.069,22.119 178.675,25.725 178.675,36.578 179.847,37.75 182.086,37.75 182.961,38.625 L8.1@182.961,41.5
NetL9_1: L9.1 T1.13 | length 47.8
  Top Layer w2: T1.13@172.343,41.775 172.348,41.78 176.58,41.78 178.2,43.4 178.2,50.425 v2(178.175,50.45) ; v2(178,75.05) 180.175,75.05 181.05,74.175 L9.1@181.05,73.325 181.05,70.775 L9.1@180.175,69.9
  Bottom Layer w2: v2(178,75.05) 178.075,74.975 178.075,63.7 176.35,61.975 176.35,57.9 178.232,56.018 178.232,50.507 v2(178.175,50.45)
NetQ1_2: Q1.2 R43.2 R46.2 TP50.1 | length 15.9
  Top Layer w0.5: R43.2@170.65,82.425 170.8,82.8 170.898,83.004 cw(c171.349,82.788) 170.993,83.14 cw(c172.102,82.035) 172.102,83.6 172.103,83.6 TP50.1@181.724,83.6 ; R46.2@181.625,81.925 R46.2@181.674,81.975
  Top Layer w1: Q1.2@168.15,82.47 168.173,82.447 R43.2@170.627,82.447 ; R46.2@181.6,81.925 R46.2@181.625,81.925 ; R46.2@181.674,81.975 181.674,83.551 TP50.1@181.724,83.6
NetQ1_3: Q1.3 U2.10 | length 130.2
  Top Layer w0.5: U2.10@31.765,80.375 31.765,80.54 34.072,82.847 cw(c37.154,79.769) 37.154,84.125 153.562,84.125 cw(c153.562,81.558) 155.376,83.374 155.378,83.372 156.009,82.741 ccw(c156.664,83.397) 156.663,82.47 159.1,82.47 Q1.3@159.95,82.47
NetQ1_4: Q1.4 U2.9 | length 127.8
  Top Layer w0.5: U2.9@34.305,80.375 34.305,80.58 35.319,81.594 cw(c39.317,77.596) 39.317,83.25 141.687,83.25 cw(c141.687,79.838) 144.099,82.251 144.101,82.249 144.941,81.409 144.944,81.406 145.569,80.781 145.571,80.779 ccw(c147.511,82.719) 147.511,79.975 147.513,79.975 159.905,79.975 Q1.4@159.95,79.93
NetR1_1: R1.1 R2.2 TP6.1 U1.4 | length 12.9
  Bottom Layer w1: U1.4@14.793,66.491 14.785,66.499 14.785,68.79 16.195,70.2 R2.2@21.076,70.2 ; R1.1@21.051,71.625 21.064,71.612 21.064,70.213 R2.2@21.076,70.2 ; TP6.1@23.35,70.225 23.337,70.212 21.089,70.212 R2.2@21.076,70.2
NetR3_1: R3.1 TP9.1 U2.4 | length 86.3
  Bottom Layer w0.8: U2.4@47.005,80.375 47.005,80.48 48.045,81.52 cw(c50.653,78.912) 50.653,82.6 50.655,82.6 117.784,82.6 cw(c117.784,67.811) 128.236,78.273 TP9.1@128.871,77.638
  Bottom Layer w1: R3.1@128.867,75.426 128.871,75.429 TP9.1@128.871,77.638
NetR3_2: R3.2 R6.1 TP14.1 VD4.1 VT2.1 | length 18.7
  Bottom Layer w1: R6.1@120.65,75.6 120.935,75.284 cw(c118.454,73.05) 121.792,73.05 VD4.1@122.506,72.35 122.519,72.337 124.175,72.337 ; TP14.1@123.95,76.125 123.95,72.562 124.175,72.337 ; VT2.1@128.867,67.725 R3.2@128.867,72.324 128.855,72.337 124.175,72.337
NetR4_1: R4.1 TP10.1 U2.2 | length 46.3
  Top Layer w0.8: U2.2@52.085,80.375 52.085,80.585 53.085,81.585 cw(c54.51,80.16) 54.51,82.175 86.711,82.175 cw(c86.711,76.017) 91.067,80.37 TP10.1@93.562,77.875
  Bottom Layer w1: R4.1@93.567,75.385 TP10.1@93.567,77.87
  Bottom Layer w2: TP10.1@93.562,77.875 TP10.1@93.567,77.87
NetR4_2: R4.2 R5.1 TP15.1 VD3.1 VT1.1 | length 18.5
  Bottom Layer w1: R5.1@85.185,75.416 cw(c82.767,72.998) 86.186,73 VD3.1@86.884,72.3 87.554,72.97 87.554,75.229 TP15.1@87.8,75.475 ; VD3.1@86.895,72.289 93.562,72.289 R4.2@93.572,72.278 VT1.1@93.572,67.651
NetR5_2: R5.2 T2.1 TP16.1 U2.3 VD3.2 VT1.3 VT2.2 | length 122.5
  Top Layer w0.8: U2.3@49.545,80.375 49.545,80.21 49.718,80.007 50.917,78.808 ccw(c53.474,81.368) 53.474,77.75 53.476,77.75 67.696,77.75 68.291,77.859 ccw(c68.111,78.843) 68.536,77.937 ccw(c67.138,80.896) 69.578,78.715 69.713,78.867 cw(c73.408,75.095) 73.408,80.375 77.23,80.375 cw(c77.23,78.094) 78.843,79.707 78.846,79.704 79.699,78.851 79.702,78.848 cw(c78.016,77.162) 80.4,77.162 TP16.1@80.4,75.416
  Bottom Layer w1: TP16.1@80.4,75.416 80.43,75.445 83.095,75.445 R5.2@83.125,75.475 82.877,75.192 ccw(c85.345,73.03) VD3.2@82.064,73.03 ; VD3.2@81.984,72.1 82.006,71.6 ccw(c87.558,72.1) 83.614,68.161 VT1.3@85.419,66.356
  Bottom Layer w2: VD3.2@81.55,72.3 VD3.2@81.85,72.3 ; VT1.3@85.419,66.356 87.071,64.704 ccw(c101.393,79.037) 101.393,58.775 101.396,58.775 112.636,58.775 112.639,58.775 ccw(c112.639,73.829) 123.284,63.184 126.075,65.975 126.075,66.039 VT2.2@126.175,66.989 ; T2.1@106.525,32.016 ccw(c97.955,40.586) 110.075,40.586 110.075,58.425
NetR7_1: R7.1 R8.2
NetR9_1: R9.1 R10.2
NetR32_2: R32.2 R34.3 | length 3.3
  Bottom Layer w1: R34.3@231.65,82.05 231.727,82.127 232.009,82.127 232.017,82.134 232.846,82.134 233.7,81.28 R32.2@233.7,80.425
NetR33_1: R33.1 R34.1 TP32.1 | length 44.7
  Top Layer w0.5: TP32.1@198.065,83.799 206.574,83.799 207.05,84.275 224.977,84.275 cw(c224.977,80.475) 227.665,83.16 228.512,82.314 228.514,82.311 cw(c226.435,80.232) 229.375,80.235 ccw(c231.759,80.232) 230.073,78.547 230.075,78.545 R34.1@231.65,76.97 231.65,76.52 R34.1@231.65,76.51
  Bottom Layer w0.5: TP32.1@198.065,83.799 198.065,81.457 ccw(c200.52,81.456) 198.784,79.72 200.091,78.413 200.091,78.4 200.241,78.25 R33.1@200.466,78.25
NetR34_2: R34.2 U4.3 | length 23.7
  Bottom Layer w0.5: U4.3@215.207,70.84 215.884,70.84 216.244,71.2 218.725,71.2 221.156,68.769 221.159,68.766 ccw(c222.104,69.711) 222.104,68.375 222.105,68.375 222.411,68.375 222.413,68.375 ccw(c222.413,71.15) 224.376,69.189 228.61,73.423 ccw(c225.379,76.657) 229.95,76.657 229.95,76.658 229.95,77.128 229.95,77.129 cw(c231.449,77.129) 230.39,78.19 231.65,79.45 R34.2@231.65,79.51
NetR36_2: R36.2 TP35.1 U4.6 | length 16.3
  Top Layer w0.5: v1(209.375,70.84) 209.793,70.84 ccw(c209.788,77.398) 214.427,72.762 R36.2@221.175,79.51
  Bottom Layer w0.5: v1(209.375,70.84) U4.6@210.575,70.84
NetR40_1: R40.1 R41.2 TP45.1 U5.4 | length 20.9
  Bottom Layer w1: U5.4@235.027,15.91 235.035,15.918 235.035,17.964 235.621,18.55 240.5,18.55 ; R41.2@240.525,17.86 R40.1@240.525,19.127 ; R41.2@240.87,18.18 241.241,18.55 242.915,18.55 247.325,14.14 TP45.1@247.325,10.75
NetR42_2: R42.2 R43.1 VD9.1 VD10.1 | length 66
  Top Layer w0.5: R43.1@172.65,82.425 172.7,82.375 174.45,82.375 R42.2@174.5,82.325 174.65,81.95 175.206,81.394 ccw(c176.218,82.407) 176.218,80.975 182.824,80.975 ccw(c182.823,82.005) 183.552,81.277 183.685,81.41 cw(c185.049,80.045) 185.049,81.975 185.051,81.975 193.791,81.975 cw(c193.791,77.97) 196.623,80.802 196.952,80.473 196.954,80.471 ccw(c198.574,82.092) 198.574,79.8 198.576,79.8 201.864,79.8 cw(c201.868,76.645) 204.104,78.871 cw(c202.225,77.002) 204.875,77.003 204.875,77.001 204.875,70.268 cw(c202.9,70.268) 204.296,68.871 203.249,67.824 203.067,67.643 ccw(c203.651,67.059) 202.825,67.059 202.825,66.922 ccw(c203.878,66.922) 203.132,66.179 ccw(c203.925,66.97) 203.925,65.85 203.928,65.85 209.201,65.85 ccw(c209.199,67.922) 210.967,66.842 cw(c212.493,65.32) 212.493,67.475 212.494,67.475 215.079,67.475 ccw(c215.079,71.423) v1@218.076,68.853
  Bottom Layer w0.5: VD9.1@216.916,67.675 217.116,67.875 v1(218.086,68.845) 218.141,68.9 VD10.1@218.141,70.225
NetTP40_1: TP40.1 U4.7 VD9.2 | length 8.2
  Bottom Layer w0.5: U4.7@210.575,72.11 211.956,72.11 212.841,71.225 212.841,68.542 VD9.2@213.507,67.875 ; TP40.1@213.7,65.7 TP40.1@213.717,65.717 ; TP40.1@213.749,65.717 VD9.2@213.749,67.633
PWM_I: P1.3 R29.1 | length 36.6
  Bottom Layer w0.5: R29.1@206.991,65.125 207.366,65.275 207.366,65.327 207.899,65.861 cw(c208.416,65.344) 208.416,66.075 209.5,66.075 cw(c209.499,65.108) 209.502,66.075 cw(c209.499,65.108) 210.182,65.793 211.162,64.813 ccw(c213.91,66.963) 214.164,63.483 214.468,63.48 ccw(c214.663,83.134) 228.564,69.239 237.162,77.837 P1.3@237.217,77.837
PWM_V: P1.1 R27.1 | length 42.3
  Top Layer w0.5: v1@203.922,67.197 208.135,71.41 cw(c209.799,69.749) 209.799,72.1 ccw(c209.799,75.689) 212.338,73.153 219.05,79.865 cw(c221.247,77.67) 221.247,80.775 221.248,80.775 v1@224.7,80.775
  Bottom Layer w0.5: R27.1@201.841,68.925 202.066,68.925 203.758,67.232 203.843,67.232 v1(203.9,67.175) ; v1@224.75,80.775 227.045,80.775 227.046,80.775 ccw(c227.046,83.137) 228.718,81.468 230.136,82.886 cw(c231.314,81.712) 231.314,83.375 231.316,83.375 233.725,83.375 234.135,82.965 P1.1@237.225,82.965
  other v1: 224.725,80.75
pads on no net: K1.5 T1.2 T1.11 U2.11 U2.13 U2.14 VT1.0 VT2.0

## Keep-outs
Keep-Out Layer:
  circle w0.254: c5,5 r1.5
  circle w0.254: c245,5 r1.5
  circle w0.254: c245,80 r1.5
  circle w0.254: c5,80 r1.5
  lines w0.254: 0,80 cw(c5,80) 5,85 245,85 cw(c245,80) 250,80 250,4.95 ; 0,80.029 0,5 ccw(c5,5) 5,0 ; 5.014,0 245,0 ccw(c245,5) 250,5

## Other copper
Bottom Layer:
  rectangle net +550V: 90.925,46.175 94.85,51.228
  rectangle net GND: 90.925,3.343 94.825,8.098
  rectangle net NetR9_1: 90.95,12.938 94.8,16.807
  rectangle net NetC11_2: 90.9,21.525 95.025,32.675
  rectangle net NetR7_1: 90.95,37.475 94.8,41.463

## Silkscreen, mask and mechanical layers (free items; w line width, h text height)
Top Overlay:
  circle w1: c5,5 r2.2
  circle w1: c245,80 r2.2
  circle w1: c5,80 r2.2
  circle w1: c245,5 r2.2
  text "PWM_I_G_V" at 241.699,77.279 h0.8 r90
  text "+15V_2 GND2" at 249.163,53.354 h0.8 r90
  text "+15V_1 GND1" at 249.113,43.279 h0.8 r90
  text "b" at 236.388,38.875 h18 r90
  text "AC_IN" at 0.721,34.896 h1 r270
  text "+5V GND" at 249.246,34.204 h0.8 r90

## Text inside footprints (layer, text, board x,y; h text height)
C11: Top Overlay "-" at 51.682,35.957 h3.05 r270; Top Overlay "+" at 52.19,46.625 h3.05 r270
C12: Top Overlay "+" at 52.19,22.175 h3.05 r270; Top Overlay "-" at 51.682,11.507 h3.05 r270
C13: Top Overlay "+" at 76.24,46.625 h3.05 r270; Top Overlay "-" at 75.732,35.957 h3.05 r270
C14: Top Overlay "-" at 75.732,11.382 h3.05 r270; Top Overlay "+" at 76.24,22.05 h3.05 r270
D1: Top Overlay "- AC AC +" at 25.846,12.821 h0.8 r180
U2: Bottom Overlay "P_2" at 21.351,82.026 h0.76 r270; Bottom Overlay "P_1" at 23.891,82.026 h0.76 r270; Bottom Overlay "VCC" at 54.244,82.026 h0.76 r270; Bottom Overlay "HO" at 51.704,82.026 h0.76 r270; Bottom Overlay "VS" at 49.164,82.026 h0.76 r270; Bottom Overlay "LO" at 46.624,82.026 h0.76 r270; Bottom Overlay "GND" at 44.084,82.026 h0.76 r270; Bottom Overlay "GND" at 41.544,82.026 h0.76 r270; Bottom Overlay "IS" at 39.004,82.026 h0.76 r270; Bottom Overlay "FB" at 36.464,82.026 h0.76 r270; Bottom Overlay "VC" at 33.924,82.026 h0.76 r270; Bottom Overlay "VE" at 31.384,82.026 h0.76 r270; Bottom Overlay "VCC" at 28.844,82.026 h0.76 r270; Bottom Overlay "GND" at 26.304,82.026 h0.76 r270; Top Overlay "P_2" at 21.351,78.47 h0.76 r270; Top Overlay "P_1" at 23.891,78.47 h0.76 r270; Top Overlay "GND" at 26.304,78.47 h0.76 r270; Top Overlay "VCC" at 28.844,78.47 h0.76 r270; Top Overlay "VE" at 31.384,78.47 h0.76 r270; Top Overlay "VC" at 33.924,78.47 h0.76 r270; Top Overlay "FB" at 36.464,78.47 h0.76 r270; Top Overlay "IS" at 39.004,78.47 h0.76 r270; Top Overlay "GND" at 41.544,78.47 h0.76 r270; Top Overlay "GND" at 44.084,78.47 h0.76 r270; Top Overlay "LO" at 46.624,78.47 h0.76 r270; Top Overlay "VS" at 49.164,78.47 h0.76 r270; Top Overlay "HO" at 51.704,78.47 h0.76 r270; Top Overlay "VCC" at 54.244,78.47 h0.76 r270